# Altium PCB AVP32F335-V1.1.PcbDoc
Units mm, origin at the board's own origin, x right, y up, seen from the top; angles counter-clockwise.
Board outline 58.16 x 58.08 mm, 2 copper layers (Top Layer, Bottom Layer), stack 1.671 mm thick; 2 components, 176 nets, 358 pads, 1 vias.
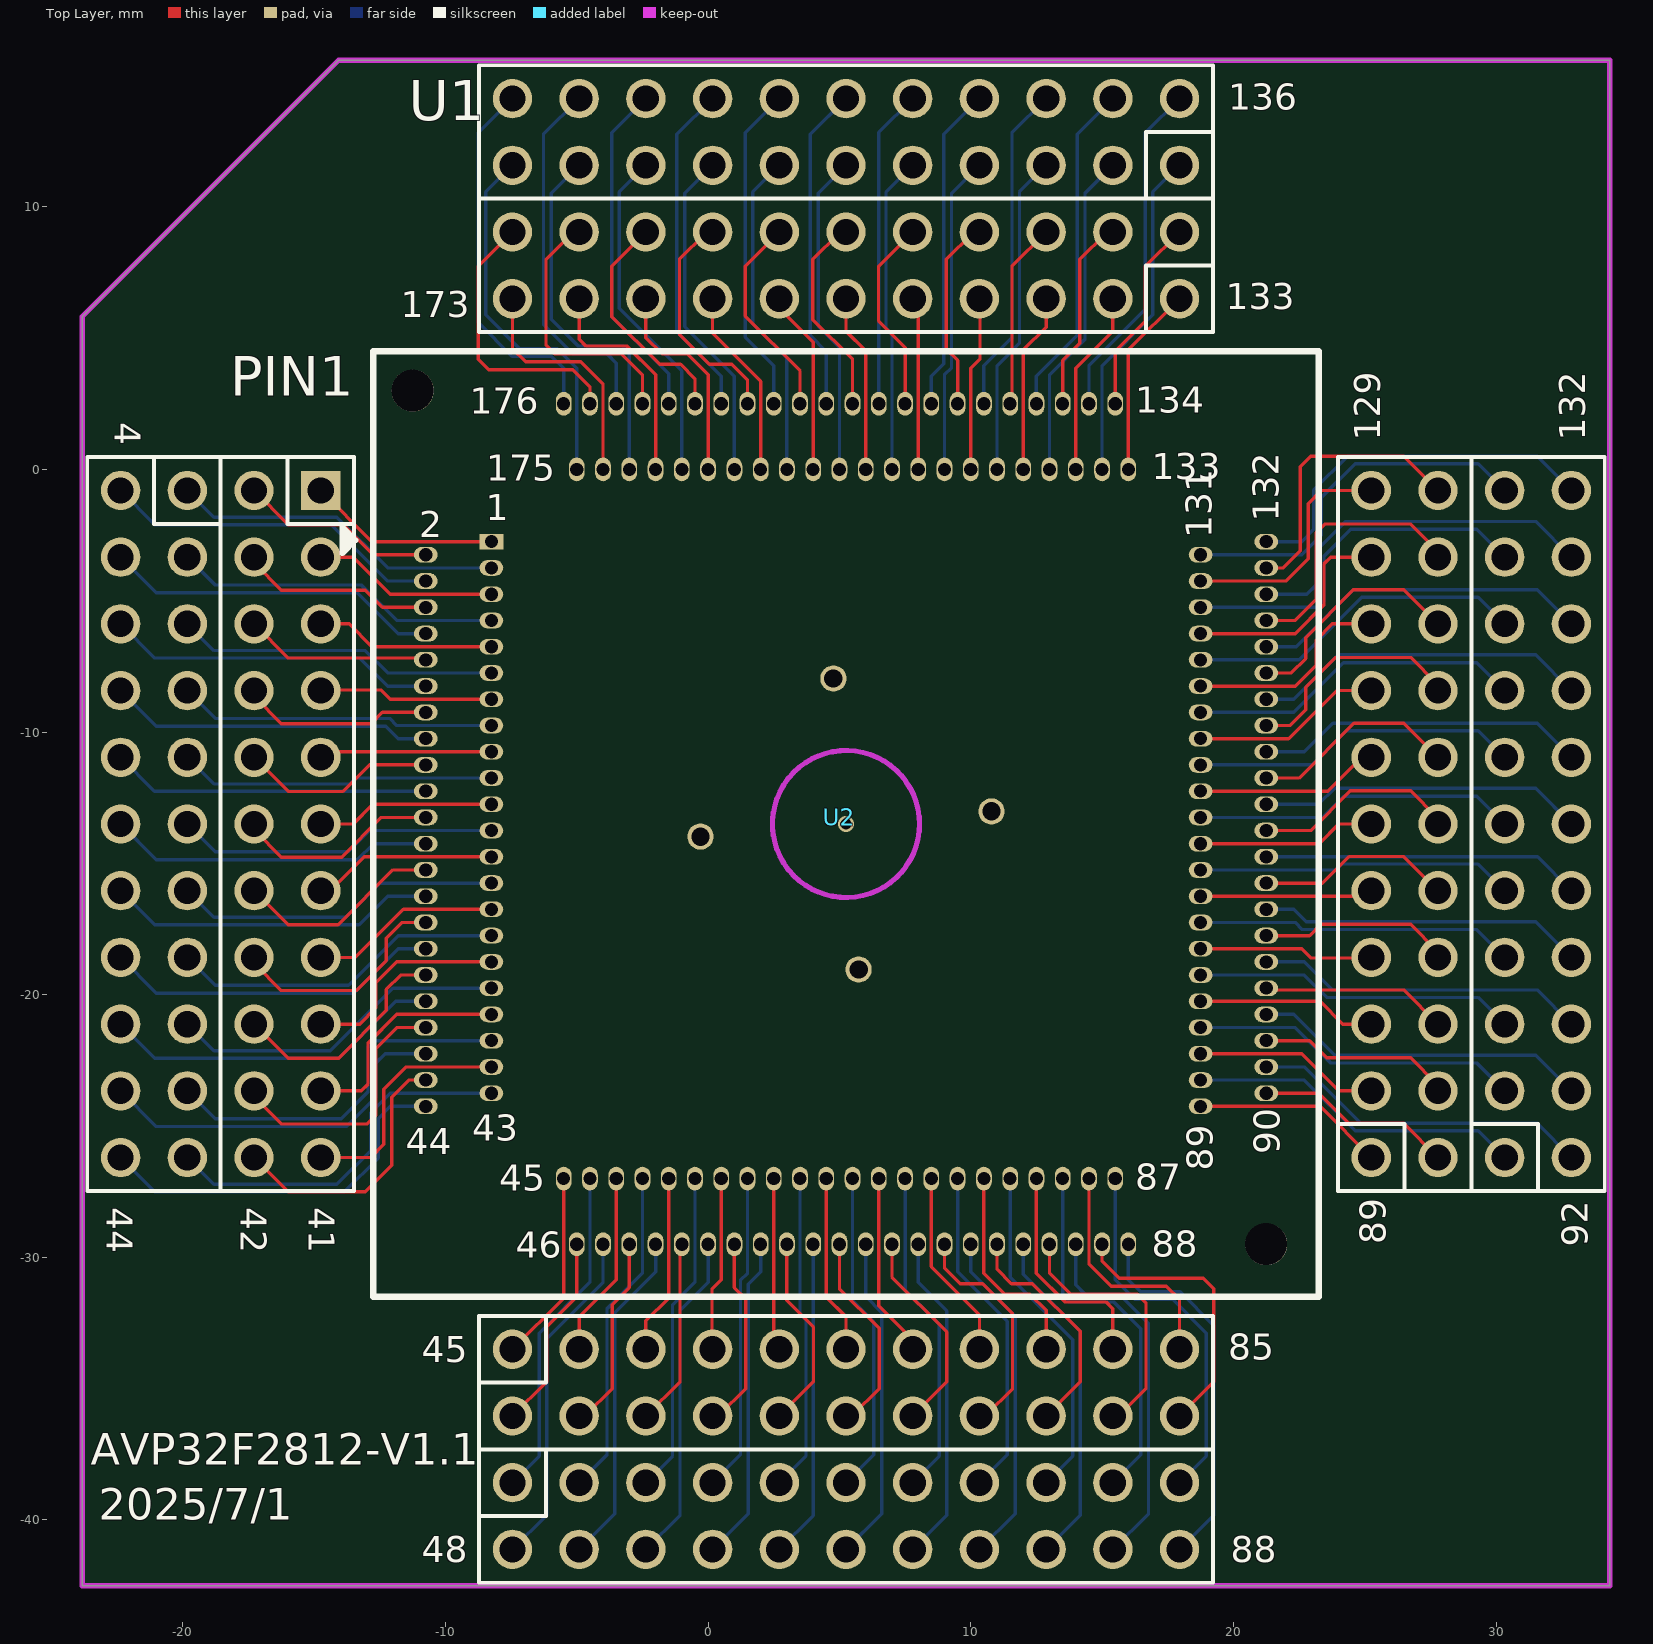
[diagram p0: Top Layer view]
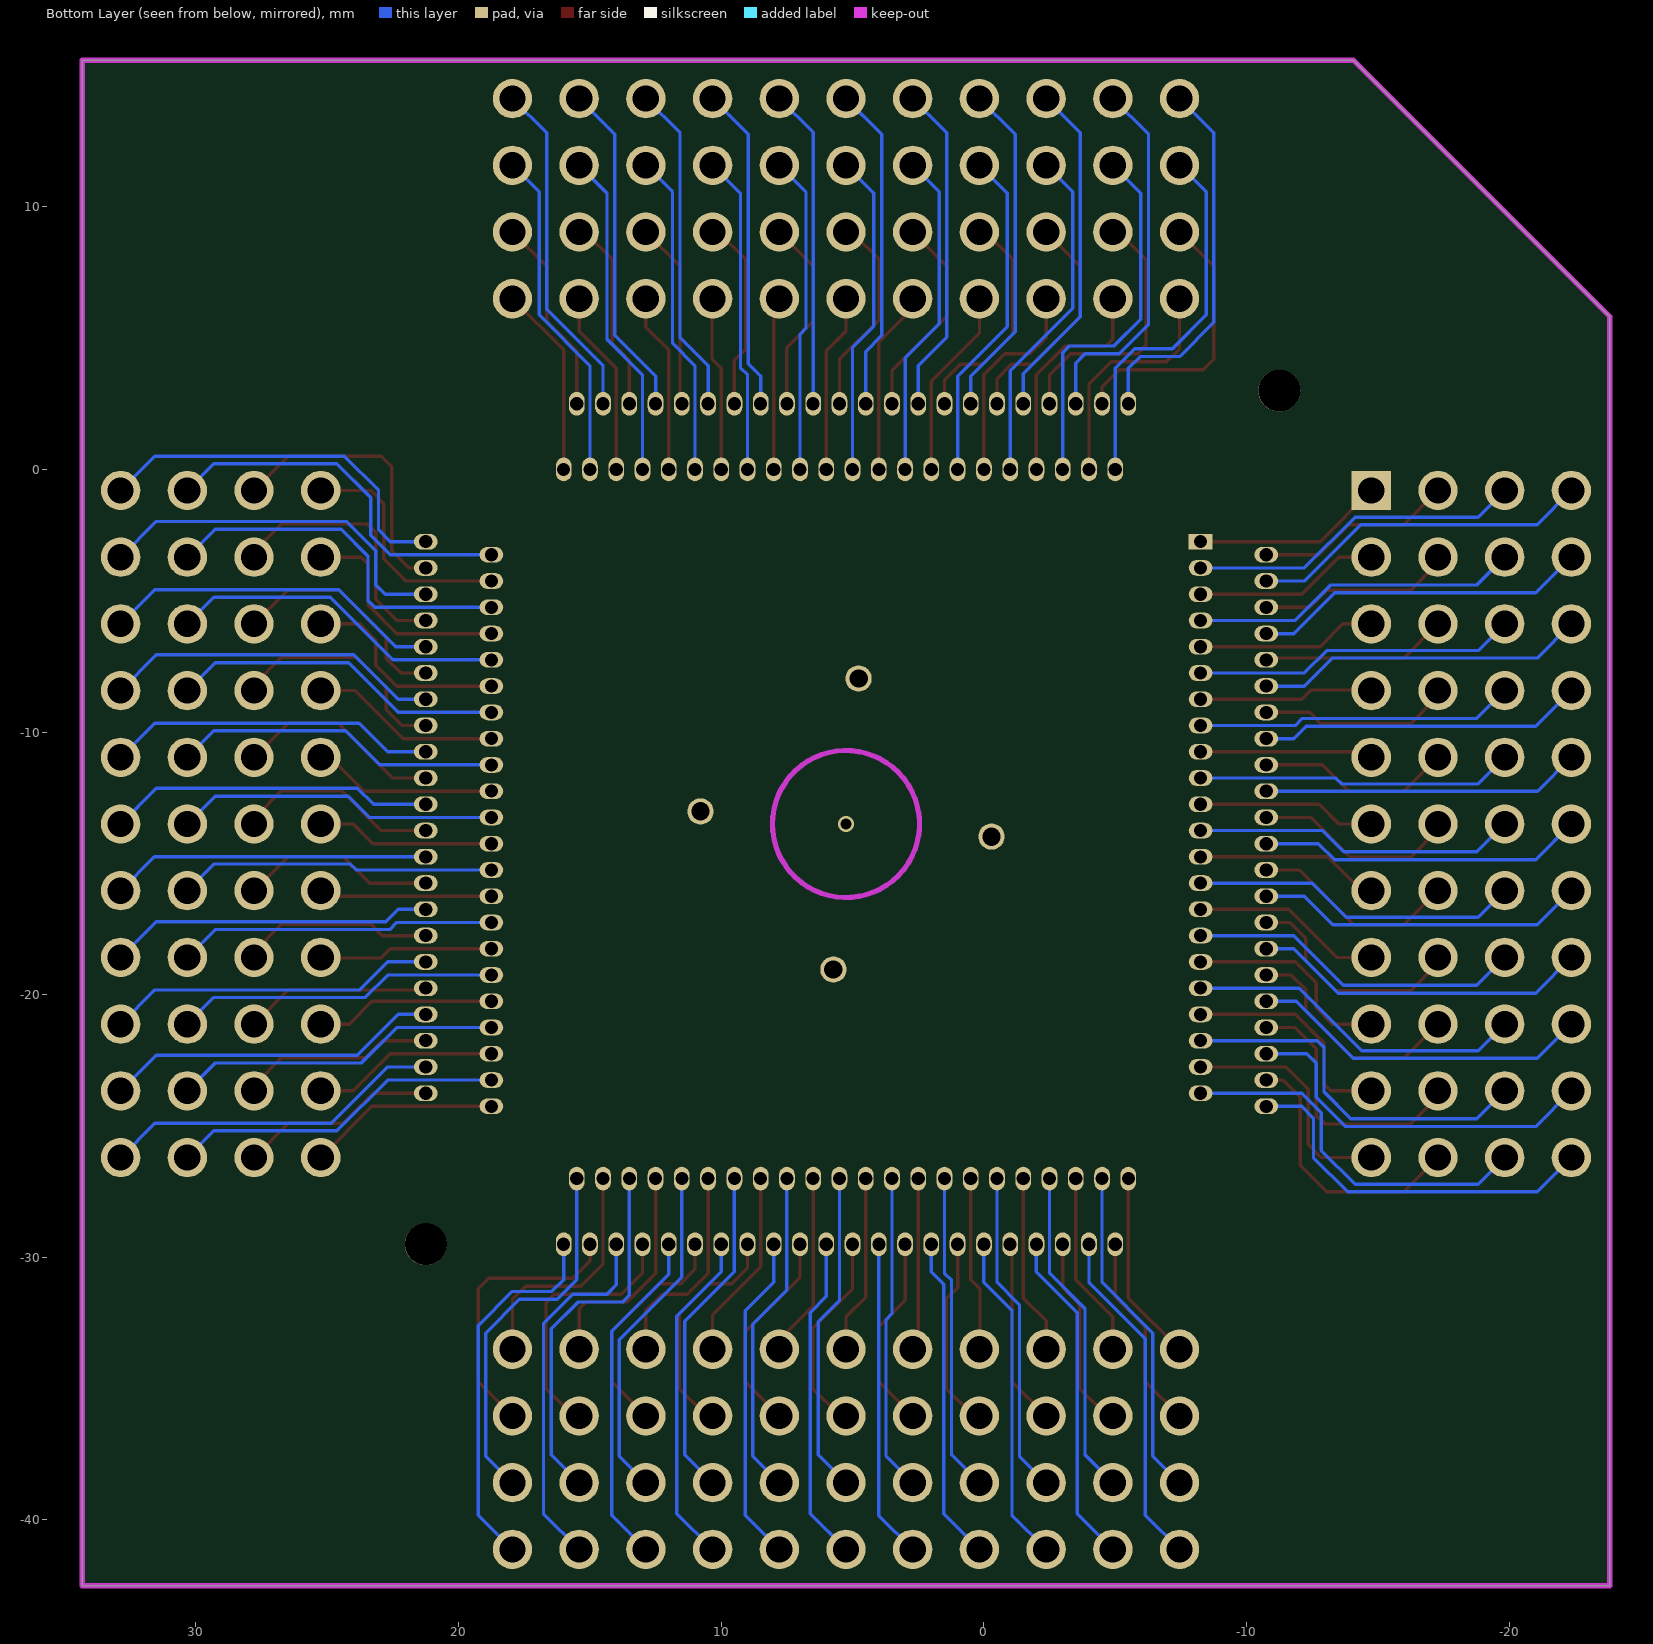
[diagram p1: Bottom Layer view, seen from below]

## Layer stack, top to bottom
Top Solder: solder mask 0.0102, Solder Resist, Dk 3.5
Top Layer: signal copper 0.0356
Dielectric1: dielectric 1.6, FR-4, Dk 4.8
Bottom Layer: signal copper 0.0356
Bottom Solder: solder mask 0.0102, Solder Resist, Dk 3.5

## Board outline
-23.83,-42.5 -23.83,5.82 -14.07,15.58 34.33,15.58 34.33,-42.5

## Design rules (kind name [scope] priority, off if disabled: settings)
Clearance [All] p1: gap=0.127 ignorepadtopadclearanceinfootprint=FALSE except(0: Arc-Hole Track-Hole SMDPad-Hole THPad-Hole Via-Hole Fill-Hole Poly-Hole Region-Hole Text-Hole)
ComponentClearance [All] p1: gap=0 collisioncheckmode=3 verticalgap=0 showdistances=FALSE
FabricationTestpoint [(IsPad And (OnTopLayer Or OnBottomLayer))] p1: side=3 testpointundercomponent=TRUE minsize=1.016 maxsize=2.54 preferedsize=1.524 minholesize=0 maxholesize=1.016 preferedholesize=0.813 testpointgrid=0.025 allowsidetop=TRUE allowsidebottom=TRUE usegrid=TRUE gridtolerance=0
HoleSize [All] p1: absolutevalues=TRUE maxlimit=10 minlimit=0.025 maxpercent=80.000 minpercent=20.000
PolygonConnect PolygonConnect_PAD [(HasFootprint('IDC2X12B') OR HasFootprint('QFP-80-CSZ') OR HasFootprint('IDC14-L') OR HasFootprint('IDC14-L') OR HasFootprint('SO-8') OR HasFootprint('DC-005') OR HasFootprint('QFN-48_TEST2') OR HasFootprint('SMD_LED0805_LED') OR HasFootprint('SOT-23-6') OR HasFootprint('SC70-5') OR HasFootprint('SOT-25') OR HasFootprint('CASE-B_3528') OR HasFootprint('Keystone5002') OR HasFootprint('MOS-SOT23'))] p1: connectstyle=Relief reliefconductorwidth=0.254 reliefentries=4 polygonreliefangle="45 Angle" airgapwidth=0.254
PolygonConnect [All] p2: connectstyle=Direct reliefconductorwidth=0.254 reliefentries=4 polygonreliefangle="90 Angle" airgapwidth=0.254
RoutingVias [All] p1: holewidth=0.381 width=0.787 viastyle="Through Hole" minholewidth=0.254 minwidth=0.762 maxholewidth=0.711 maxwidth=1.27
SolderMaskExpansion [All] p1: expansion=0.102
Width [All] p1: maxlimit=25.4 minlimit=0.1 preferedwidth=0.203 minimp=50.000000 maximp=50.000000 favimp=50.000000
27 further rules are at their usual default settings.

## Components (designator, comment, footprint, x,y, rotation, side; value= is the part's Value field where it differs from the comment)
U1 "ADP32F2812" AVP32F335 5.25,-13.5 r0 top locked
U2 "ADP32F2812" OTQ-176-0.5-10a 5.25,-13.5 r0 top locked

## Footprints (in the part's own frame and the unit in brackets; to place one, negate y for a bottom-side part, rotate by r counter-clockwise, add the part's x,y. Pads: shape width x height; smd on the part's side, far side on the other; paste and mask are expansions set on the pad)
AVP32F335 [mm]
  rect 1.5x1.5 hole 1: 1(-20,12.7)
  round 1.5 hole 1: 2(-22.54,12.7) 3(-25.08,12.7) 4(-27.62,12.7) 5(-20,10.16) 6(-22.54,10.16) 7(-25.08,10.16) 8(-27.62,10.16) 9(-20,7.62) 10(-22.54,7.62) 11(-25.08,7.62) 12(-27.62,7.62) 13(-20,5.08) 14(-22.54,5.08) 15(-25.08,5.08) 16(-27.62,5.08) 17(-20,2.54) 18(-22.54,2.54) 19(-25.08,2.54) 20(-27.62,2.54) 21(-20,0) 22(-22.54,0) 23(-25.08,0) 24(-27.62,0) 25(-20,-2.54) 26(-22.54,-2.54) 27(-25.08,-2.54) 28(-27.62,-2.54) 29(-20,-5.08) 30(-22.54,-5.08) 31(-25.08,-5.08) 32(-27.62,-5.08) 33(-20,-7.62) 34(-22.54,-7.62) 35(-25.08,-7.62) 36(-27.62,-7.62) 37(-20,-10.16) 38(-22.54,-10.16) 39(-25.08,-10.16) 40(-27.62,-10.16) 41(-20,-12.7) 42(-22.54,-12.7) 43(-25.08,-12.7) 44(-27.62,-12.7) 45(-12.7,-20) 46(-12.7,-22.54) 47(-12.7,-25.08) 48(-12.7,-27.62) 49(-10.16,-20) 50(-10.16,-22.54) 51(-10.16,-25.08) 52(-10.16,-27.62) 53(-7.62,-20) 54(-7.62,-22.54) 55(-7.62,-25.08) 56(-7.62,-27.62) 57(-5.08,-20) 58(-5.08,-22.54) 59(-5.08,-25.08) 60(-5.08,-27.62) 61(-2.54,-20) 62(-2.54,-22.54) 63(-2.54,-25.08) 64(-2.54,-27.62) 65(0,-20) 66(0,-22.54) 67(0,-25.08) 68(0,-27.62) 69(2.54,-20) 70(2.54,-22.54) 71(2.54,-25.08) 72(2.54,-27.62) 73(5.08,-20) 74(5.08,-22.54) 75(5.08,-25.08) 76(5.08,-27.62) 77(7.62,-20) 78(7.62,-22.54) 79(7.62,-25.08) 80(7.62,-27.62) 81(10.16,-20) 82(10.16,-22.54) 83(10.16,-25.08) 84(10.16,-27.62) 85(12.7,-20) 86(12.7,-22.54) 87(12.7,-25.08) 88(12.7,-27.62) 89(20,-12.7) 90(22.54,-12.7) 91(25.08,-12.7) 92(27.62,-12.7) 93(20,-10.16) 94(22.54,-10.16) 95(25.08,-10.16) 96(27.62,-10.16) 97(20,-7.62) 98(22.54,-7.62) 99(25.08,-7.62) 100(27.62,-7.62) 101(20,-5.08) 102(22.54,-5.08) 103(25.08,-5.08) 104(27.62,-5.08) 105(20,-2.54) 106(22.54,-2.54) 107(25.08,-2.54) 108(27.62,-2.54) 109(20,0) 110(22.54,0) 111(25.08,0) 112(27.62,0) 113(20,2.54) 114(22.54,2.54) 115(25.08,2.54) 116(27.62,2.54) 117(20,5.08) 118(22.54,5.08) 119(25.08,5.08) 120(27.62,5.08) 121(20,7.62) 122(22.54,7.62) 123(25.08,7.62) 124(27.62,7.62) 125(20,10.16) 126(22.54,10.16) 127(25.08,10.16) 128(27.62,10.16) 129(20,12.7) 130(22.54,12.7) 131(25.08,12.7) 132(27.62,12.7) 133(12.7,20) 134(12.7,22.54) 135(12.7,25.08) 136(12.7,27.62) 137(10.16,20) 138(10.16,22.54) 139(10.16,25.08) 140(10.16,27.62) 141(7.62,20) 142(7.62,22.54) 143(7.62,25.08) 144(7.62,27.62) 145(5.08,20) 146(5.08,22.54) 147(5.08,25.08) 148(5.08,27.62) 149(2.54,20) 150(2.54,22.54) 151(2.54,25.08) 152(2.54,27.62) 153(0,20) 154(0,22.54) 155(0,25.08) 156(0,27.62) 157(-2.54,20) 158(-2.54,22.54) 159(-2.54,25.08) 160(-2.54,27.62) 161(-5.08,20) 162(-5.08,22.54) 163(-5.08,25.08) 164(-5.08,27.62) 165(-7.62,20) 166(-7.62,22.54) 167(-7.62,25.08) 168(-7.62,27.62) 169(-10.16,20) 170(-10.16,22.54) 171(-10.16,25.08) 172(-10.16,27.62) 173(-12.7,20) 174(-12.7,22.54) 175(-12.7,25.08) 176(-12.7,27.62)
  silkscreen extent -28.89,-28.89 28.89,28.89
OTQ-176-0.5-10a [mm]
  round 1.6 hole 1.6: 0(-16.5,16.5) 0(16,-16)
  round 1 hole 0.7: 0(-5.54,-0.48) 0(-0.48,5.54) 0(0.48,-5.54) 0(5.54,0.48)
  rect 0.9x0.6 hole 0.5: 1(-13.5,10.75)
  oval 0.9x0.6 hole 0.5: 2(-16,10.25) 3(-13.5,9.75) 4(-16,9.25) 5(-13.5,8.75) 6(-16,8.25) 7(-13.5,7.75) 8(-16,7.25) 9(-13.5,6.75) 10(-16,6.25) 11(-13.5,5.75) 12(-16,5.25) 13(-13.5,4.75) 14(-16,4.25) 15(-13.5,3.75) 16(-16,3.25) 17(-13.5,2.75) 18(-16,2.25) 19(-13.5,1.75) 20(-16,1.25) 21(-13.5,0.75) 22(-16,0.25) 23(-13.5,-0.25) 24(-16,-0.75) 25(-13.5,-1.25) 26(-16,-1.75) 27(-13.5,-2.25) 28(-16,-2.75) 29(-13.5,-3.25) 30(-16,-3.75) 31(-13.5,-4.25) 32(-16,-4.75) 33(-13.5,-5.25) 34(-16,-5.75) 35(-13.5,-6.25) 36(-16,-6.75) 37(-13.5,-7.25) 38(-16,-7.75) 39(-13.5,-8.25) 40(-16,-8.75) 41(-13.5,-9.25) 42(-16,-9.75) 43(-13.5,-10.25) 44(-16,-10.75) 89(13.5,-10.75) 90(16,-10.25) 91(13.5,-9.75) 92(16,-9.25) 93(13.5,-8.75) 94(16,-8.25) 95(13.5,-7.75) 96(16,-7.25) 97(13.5,-6.75) 98(16,-6.25) 99(13.5,-5.75) 100(16,-5.25) 101(13.5,-4.75) 102(16,-4.25) 103(13.5,-3.75) 104(16,-3.25) 105(13.5,-2.75) 106(16,-2.25) 107(13.5,-1.75) 108(16,-1.25) 109(13.5,-0.75) 110(16,-0.25) 111(13.5,0.25) 112(16,0.75) 113(13.5,1.25) 114(16,1.75) 115(13.5,2.25) 116(16,2.75) 117(13.5,3.25) 118(16,3.75) 119(13.5,4.25) 120(16,4.75) 121(13.5,5.25) 122(16,5.75) 123(13.5,6.25) 124(16,6.75) 125(13.5,7.25) 126(16,7.75) 127(13.5,8.25) 128(16,8.75) 129(13.5,9.25) 130(16,9.75) 131(13.5,10.25) 132(16,10.75)
  oval 0.6x0.9 hole 0.5: 45(-10.75,-13.5) 46(-10.25,-16) 47(-9.75,-13.5) 48(-9.25,-16) 49(-8.75,-13.5) 50(-8.25,-16) 51(-7.75,-13.5) 52(-7.25,-16) 53(-6.75,-13.5) 54(-6.25,-16) 55(-5.75,-13.5) 56(-5.25,-16) 57(-4.75,-13.5) 58(-4.25,-16) 59(-3.75,-13.5) 60(-3.25,-16) 61(-2.75,-13.5) 62(-2.25,-16) 63(-1.75,-13.5) 64(-1.25,-16) 65(-0.75,-13.5) 66(-0.25,-16) 67(0.25,-13.5) 68(0.75,-16) 69(1.25,-13.5) 70(1.75,-16) 71(2.25,-13.5) 72(2.75,-16) 73(3.25,-13.5) 74(3.75,-16) 75(4.25,-13.5) 76(4.75,-16) 77(5.25,-13.5) 78(5.75,-16) 79(6.25,-13.5) 80(6.75,-16) 81(7.25,-13.5) 82(7.75,-16) 83(8.25,-13.5) 84(8.75,-16) 85(9.25,-13.5) 86(9.75,-16) 87(10.25,-13.5) 88(10.75,-16) 133(10.75,13.5) 134(10.25,16) 135(9.75,13.5) 136(9.25,16) 137(8.75,13.5) 138(8.25,16) 139(7.75,13.5) 140(7.25,16) 141(6.75,13.5) 142(6.25,16) 143(5.75,13.5) 144(5.25,16) 145(4.75,13.5) 146(4.25,16) 147(3.75,13.5) 148(3.25,16) 149(2.75,13.5) 150(2.25,16) 151(1.75,13.5) 152(1.25,16) 153(0.75,13.5) 154(0.25,16) 155(-0.25,13.5) 156(-0.75,16) 157(-1.25,13.5) 158(-1.75,16) 159(-2.25,13.5) 160(-2.75,16) 161(-3.25,13.5) 162(-3.75,16) 163(-4.25,13.5) 164(-4.75,16) 165(-5.25,13.5) 166(-5.75,16) 167(-6.25,13.5) 168(-6.75,16) 169(-7.25,13.5) 170(-7.75,16) 171(-8.25,13.5) 172(-8.75,16) 173(-9.25,13.5) 174(-9.75,16) 175(-10.25,13.5) 176(-10.75,16)
  Keep-Out Layer circle w0.2: c0,0 r2.8
  silkscreen extent -18,-18 18,18

## Part data
U1 U2: Mfr_Name="Texas Instruments", RefDes=RefDes, Type=Type

## Via types
v1: diameter 0.6, hole 0.4, Top Layer to Bottom Layer, 1 vias

## Nets (pads, with @x,y where several pads share a name; then routed paths per layer and width w, separated by ;. In a path a pad name is that pad's centre, name@x,y a point inside that pad or via, vN(x,y) a via of type N, cw(c..) or ccw(c..) an arc to the next point about the centre after c; other vN are vias at no path point)
NetU1_1: U1.1 U2.1 | length 7.3
  Top Layer w0.127: U1.1 -12.8,-2.75 U2.1
NetU1_2: U1.2 U2.2 | length 7.6
  Top Layer w0.127: U1.2 -15.99,-2.1 -13.9,-2.1 -12.75,-3.25 U2.2
NetU1_3: U1.3 U2.3 | length 12.8
  Bottom Layer w0.127: U1.3 -18.814,-1.816 -14.134,-1.816 -12.2,-3.75 U2.3
NetU1_4: U1.4 U2.4 | length 13
  Bottom Layer w0.127: U1.4 -21.07,-2.1 -14.35,-2.1 -12.2,-4.25 U2.4
NetU1_5: U1.5 U2.5 | length 7.1
  Top Layer w0.127: U1.5 -13.51,-3.34 -12.1,-4.75 U2.5
NetU1_6: U1.6 U2.6 | length 7.2
  Top Layer w0.127: U1.6@-17.25,-3.6 -16.25,-4.6 -13.05,-4.6 -12.4,-5.25 U2.6
NetU1_7: U1.7 U2.7 | length 12.6
  Bottom Layer w0.127: U1.7 -18.77,-4.4 -13.2,-4.4 -11.85,-5.75 U2.7
NetU1_8: U1.8 U2.8 | length 12.8
  Bottom Layer w0.127: U1.8 -21.01,-4.7 -13.35,-4.7 -11.8,-6.25 U2.8
NetU1_9: U1.9 U2.9 | length 6.9
  Top Layer w0.127: U1.9 -13.67,-5.88 -12.8,-6.75 U2.9
NetU1_10: U1.10 U2.10 | length 7.1
  Top Layer w0.127: U1.10 -15.99,-7.18 -10.82,-7.18 U2.10
NetU1_11: U1.11 U2.11 | length 12.4
  Bottom Layer w0.127: U1.11 -18.814,-6.896 -13.054,-6.896 -12.2,-7.75 U2.11
NetU1_12: U1.12 U2.12 | length 12.6
  Bottom Layer w0.127: U1.12 -21.07,-7.18 -13.27,-7.18 -12.2,-8.25 U2.12
NetU1_13: U1.13 U2.13 | length 6.7
  Top Layer w0.127: U1.13 -14.73,-8.4 -12.45,-8.4 -12.1,-8.75 U2.13
NetU1_14: U1.14 U2.14 | length 7.1
  Top Layer w0.127: U1.14@-17.25,-8.68 -16.25,-9.68 -12.83,-9.68 -12.4,-9.25 U2.14
NetU1_15: U1.15 U2.15 | length 12.1
  Bottom Layer w0.127: U1.15 -18.77,-9.48 -12.12,-9.48 -11.85,-9.75 U2.15
NetU1_16: U1.16 U2.16 | length 12.4
  Bottom Layer w0.127: U1.16 -21.01,-9.78 -12.27,-9.78 -11.8,-10.25 U2.16
NetU1_17: U1.17 U2.17 | length 6.6
  Top Layer w0.127: U1.17 -14.54,-10.75 U2.17
NetU1_18: U1.18 U2.18 | length 7.5
  Top Layer w0.127: U1.18 -15.99,-12.26 -13.9,-12.26 -12.89,-11.25 U2.18
NetU1_19: U1.19 U2.19 | length 12.1
  Bottom Layer w0.127: U1.19 -18.814,-11.976 -13.626,-11.976 -13.4,-11.75 U2.19
NetU1_20: U1.20 U2.20 | length 12.2
  Bottom Layer w0.127: U1.20 -21.08,-12.25 U2.20
NetU1_21: U1.21 U2.21 | length 6.8
  Top Layer w0.127: U1.21 -13.51,-13.5 -12.76,-12.75 U2.21
NetU1_22: U1.22 U2.22 | length 7.5
  Top Layer w0.127: U1.22@-17.25,-13.76 -16.25,-14.76 -13.95,-14.76 -12.44,-13.25 U2.22
NetU1_23: U1.23 U2.23 | length 12.4
  Bottom Layer w0.127: U1.23 -18.77,-14.56 -13.71,-14.56 -12.9,-13.75 U2.23
NetU1_24: U1.24 U2.24 | length 12.4
  Bottom Layer w0.127: U1.24 -21.01,-14.86 -13.35,-14.86 -12.74,-14.25 U2.24
NetU1_25: U1.25 U2.25 | length 6.6
  Top Layer w0.127: U1.25@-14.35,-16 -13.1,-14.75 U2.25
NetU1_26: U1.26 U2.26 | length 7.9
  Top Layer w0.127: U1.26 -15.99,-17.34 -14.09,-17.34 -12,-15.25 U2.26
NetU1_27: U1.27 U2.27 | length 12.5
  Bottom Layer w0.127: U1.27 -18.814,-17.056 -13.806,-17.056 -12.5,-15.75 U2.27
NetU1_28: U1.28 U2.28 | length 12.6
  Bottom Layer w0.127: U1.28 -21.07,-17.34 -13.29,-17.34 -12.2,-16.25 U2.28
NetU1_29: U1.29 U2.29 | length 7.3
  Top Layer w0.127: U1.29 -13.43,-18.58 -11.6,-16.75 U2.29
NetU1_30: U1.30 U2.30 | length 8.5
  Top Layer w0.127: U1.30@-17.25,-18.84 -16.25,-19.84 -13.39,-19.84 -12.25,-18.7 -12.25,-17.85 -11.65,-17.25 U2.30
NetU1_31: U1.31 U2.31 | length 12.8
  Bottom Layer w0.127: U1.31 -18.77,-19.64 -13.69,-19.64 -11.8,-17.75 U2.31
NetU1_32: U1.32 U2.32 | length 12.9
  Bottom Layer w0.127: U1.32 -21.01,-19.94 -13.49,-19.94 -11.8,-18.25 U2.32
NetU1_33: U1.33 U2.33 | length 8
  Top Layer w0.127: U1.33 -13.27,-21.12 -12.65,-20.5 -12.65,-19.55 -11.85,-18.75 U2.33
NetU1_34: U1.34 U2.34 | length 8.9
  Top Layer w0.127: U1.34 -15.99,-22.42 -14.07,-22.42 -12.25,-20.6 -12.25,-19.8 -11.7,-19.25 U2.34
NetU1_35: U1.35 U2.35 | length 13
  Bottom Layer w0.127: U1.35 -18.814,-22.136 -14.386,-22.136 -12,-19.75 U2.35
NetU1_36: U1.36 U2.36 | length 13.1
  Bottom Layer w0.127: U1.36 -21.07,-22.42 -14.07,-22.42 -11.9,-20.25 U2.36
NetU1_37: U1.37 U2.37 | length 8.6
  Top Layer w0.127: U1.37 -13.21,-23.66 -12.95,-23.4 -12.95,-21.85 -11.85,-20.75 U2.37
NetU1_38: U1.38 U2.38 | length 9.9
  Top Layer w0.127: U1.38@-17.25,-23.92 -16.25,-24.92 -12.97,-24.92 -12.65,-24.6 -12.65,-22.05 -12.393,-21.793 -12.365,-21.765 -11.85,-21.25 U2.38
NetU1_39: U1.39 U2.39 | length 14.2
  Bottom Layer w0.127: U1.39 -18.77,-24.72 -13.97,-24.72 -12.95,-23.7 -12.95,-22 -12.7,-21.75 U2.39
NetU1_40: U1.40 U2.40 | length 14.1
  Bottom Layer w0.127: U1.40 -21.01,-25.02 -13.77,-25.02 -12.65,-23.9 -12.65,-22.6 -12.3,-22.25 U2.40
NetU1_41: U1.41 U2.41 | length 9.2
  Top Layer w0.127: U1.41 -12.85,-26.2 -12.35,-25.7 -12.35,-23.6 -11.5,-22.75 U2.41
NetU1_42: U1.42 U2.42 | length 10.4
  Top Layer w0.127: U1.42 -15.99,-27.5 -13.25,-27.5 -13.05,-27.5 -12.05,-26.5 -12.05,-23.9 -11.4,-23.25 U2.42
NetU1_43: U1.43 U2.43 | length 14.3
  Bottom Layer w0.127: U1.43 -18.814,-27.216 -14.134,-27.216 -12.85,-25.932 -12.85,-24.5 -12.1,-23.75 U2.43
NetU1_44: U1.44 U2.44 | length 14.4
  Bottom Layer w0.127: U1.44 -21.07,-27.5 -13.85,-27.5 -12.55,-26.2 -12.55,-24.7 -12.1,-24.25 U2.44
NetU1_45: U1.45 U2.45 | length 7.3
  Top Layer w0.127: U1.45 -5.5,-31.55 U2.45
NetU1_46: U1.46 U2.46 | length 7.6
  Top Layer w0.127: U1.46 -6.15,-34.74 -6.15,-32.65 -5,-31.5 U2.46
NetU1_47: U1.47 U2.47 | length 12.8
  Bottom Layer w0.127: U1.47 -6.434,-37.564 -6.434,-32.884 -4.5,-30.95 U2.47@-4.5,-27
NetU1_48: U1.48 U2.48 | length 13
  Bottom Layer w0.127: U1.48 -6.15,-39.82 -6.15,-33.1 -4,-30.95 U2.48
NetU1_49: U1.49 U2.49 | length 7.1
  Top Layer w0.127: U1.49 -4.91,-32.26 -3.5,-30.85 U2.49
NetU1_50: U1.50 U2.50 | length 7.2
  Top Layer w0.127: U1.50@-4.65,-36 -3.65,-35 -3.65,-31.8 -3,-31.15 U2.50
NetU1_51: U1.51 U2.51 | length 12.6
  Bottom Layer w0.127: U1.51 -3.85,-37.52 -3.85,-31.95 -2.5,-30.6 U2.51
NetU1_52: U1.52 U2.52 | length 12.8
  Bottom Layer w0.127: U1.52 -3.55,-39.76 -3.55,-32.1 -2,-30.55 U2.52
NetU1_53: U1.53 U2.53 | length 6.9
  Top Layer w0.127: U1.53 -2.37,-32.42 -1.5,-31.55 U2.53
NetU1_54: U1.54 U2.54 | length 7.1
  Top Layer w0.127: U1.54 -1.07,-34.74 -1.07,-29.57 U2.54
NetU1_55: U1.55 U2.55 | length 12.4
  Bottom Layer w0.127: U1.55 -1.354,-37.564 -1.354,-31.804 -0.5,-30.95 U2.55
NetU1_56: U1.56 U2.56 | length 12.6
  Bottom Layer w0.127: U1.56 -1.07,-39.82 -1.07,-32.02 0,-30.95 U2.56
NetU1_57: U1.57 U2.57 | length 6.7
  Top Layer w0.127: U1.57 0.15,-33.48 0.15,-31.2 0.5,-30.85 U2.57
NetU1_58: U1.58 U2.58 | length 7.1
  Top Layer w0.127: U1.58@0.43,-36 1.43,-35 1.43,-31.58 1,-31.15 U2.58
NetU1_59: U1.59 U2.59 | length 12.1
  Bottom Layer w0.127: U1.59 1.23,-37.52 1.23,-30.87 1.5,-30.6 U2.59
NetU1_60: U1.60 U2.60 | length 12.4
  Bottom Layer w0.127: U1.60 1.53,-39.76 1.53,-31.02 2,-30.55 U2.60
NetU1_61: U1.61 U2.61 | length 6.6
  Top Layer w0.127: U2.61 2.5,-33.29 U1.61
NetU1_62: U1.62 U2.62 | length 7.5
  Top Layer w0.127: U1.62 4.01,-34.74 4.01,-32.65 3,-31.64 U2.62
NetU1_63: U1.63 U2.63 | length 12.1
  Bottom Layer w0.127: U1.63 3.726,-37.564 3.726,-32.376 3.5,-32.15 U2.63
NetU1_64: U1.64 U2.64 | length 12.2
  Bottom Layer w0.127: U1.64 4,-39.83 U2.64
NetU1_65: U1.65 U2.65 | length 6.8
  Top Layer w0.127: U2.65 4.5,-31.51 5.25,-32.26 U1.65
NetU1_66: U1.66 U2.66 | length 7.5
  Top Layer w0.127: U2.66 5,-31.19 6.51,-32.7 6.51,-35 U1.66@5.51,-36
NetU1_67: U1.67 U2.67 | length 12.4
  Bottom Layer w0.127: U1.67 6.31,-37.52 6.31,-32.46 5.5,-31.65 U2.67@5.5,-27
NetU1_68: U1.68 U2.68 | length 12.4
  Bottom Layer w0.127: U1.68 6.61,-39.76 6.61,-32.1 6,-31.49 U2.68
NetU1_69: U1.69 U2.69 | length 6.6
  Top Layer w0.127: U2.69 6.5,-31.85 U1.69@7.75,-33.1
NetU1_70: U1.70 U2.70 | length 7.9
  Top Layer w0.127: U2.70 7,-30.75 9.09,-32.84 9.09,-34.74 U1.70
NetU1_71: U1.71 U2.71 | length 12.5
  Bottom Layer w0.127: U2.71 7.5,-31.25 8.806,-32.556 8.806,-37.564 U1.71
NetU1_72: U1.72 U2.72 | length 12.6
  Bottom Layer w0.127: U1.72 9.09,-39.82 9.09,-32.04 8,-30.95 U2.72
NetU1_73: U1.73 U2.73 | length 7.3
  Top Layer w0.127: U2.73 8.5,-30.35 10.33,-32.18 U1.73
NetU1_74: U1.74 U2.74 | length 8.5
  Top Layer w0.127: U2.74 9,-30.4 9.6,-31 10.45,-31 11.59,-32.14 11.59,-35 U1.74@10.59,-36
NetU1_75: U1.75 U2.75 | length 12.8
  Bottom Layer w0.127: U2.75 9.5,-30.55 11.39,-32.44 11.39,-37.52 U1.75
NetU1_76: U1.76 U2.76 | length 12.9
  Bottom Layer w0.127: U2.76 10,-30.55 11.69,-32.24 11.69,-39.76 U1.76
NetU1_77: U1.77 U2.77 | length 8
  Top Layer w0.127: U2.77 10.5,-30.6 11.3,-31.4 12.25,-31.4 12.87,-32.02 U1.77
NetU1_78: U1.78 U2.78 | length 8.9
  Top Layer w0.127: U2.78 11,-30.45 11.55,-31 12.35,-31 14.17,-32.82 14.17,-34.74 U1.78
NetU1_79: U1.79 U2.79 | length 13
  Bottom Layer w0.127: U2.79 11.5,-30.75 13.886,-33.136 13.886,-37.564 U1.79
NetU1_80: U1.80 U2.80 | length 13.1
  Bottom Layer w0.127: U2.80 12,-30.65 14.17,-32.82 14.17,-39.82 U1.80
NetU1_81: U1.81 U2.81 | length 8.6
  Top Layer w0.127: U2.81 12.5,-30.6 13.6,-31.7 15.15,-31.7 15.41,-31.96 U1.81
NetU1_82: U1.82 U2.82 | length 9.9
  Top Layer w0.127: U2.82 13,-30.6 13.515,-31.115 13.543,-31.143 13.8,-31.4 16.35,-31.4 16.67,-31.72 16.67,-35 U1.82@15.67,-36
NetU1_83: U1.83 U2.83 | length 14.2
  Bottom Layer w0.127: U2.83 13.5,-31.45 13.75,-31.7 15.45,-31.7 16.47,-32.72 16.47,-37.52 U1.83
NetU1_84: U1.84 U2.84 | length 14.1
  Bottom Layer w0.127: U2.84 14,-31.05 14.35,-31.4 15.65,-31.4 16.77,-32.52 16.77,-39.76 U1.84
NetU1_85: U1.85 U2.85 | length 9.2
  Top Layer w0.127: U2.85 14.5,-30.25 15.35,-31.1 17.45,-31.1 17.95,-31.6 U1.85
NetU1_86: U1.86 U2.86 | length 10.7
  Top Layer w0.127: U2.86 15,-30.15 15.65,-30.8 18.85,-30.8 19.25,-31.2 19.25,-34.74 U1.86
NetU1_87: U1.87 U2.87 | length 14.3
  Bottom Layer w0.127: U2.87@15.5,-27 15.5,-30.85 16.25,-31.6 17.682,-31.6 18.966,-32.884 18.966,-37.564 U1.87
NetU1_88: U1.88 U2.88 | length 14.4
  Bottom Layer w0.127: U2.88 16,-30.85 16.45,-31.3 17.95,-31.3 19.25,-32.6 19.25,-39.82 U1.88
NetU1_89: U1.89 U2.89 | length 7.3
  Top Layer w0.127: U2.89 23.3,-24.25 U1.89
NetU1_90: U1.90 U2.90 | length 7.6
  Top Layer w0.127: U2.90 23.25,-23.75 24.4,-24.9 26.49,-24.9 U1.90
NetU1_91: U1.91 U2.91 | length 12.8
  Bottom Layer w0.127: U2.91 22.7,-23.25 24.634,-25.184 29.314,-25.184 U1.91
NetU1_92: U1.92 U2.92 | length 13
  Bottom Layer w0.127: U2.92 22.7,-22.75 24.85,-24.9 31.57,-24.9 U1.92
NetU1_93: U1.93 U2.93 | length 7.1
  Top Layer w0.127: U2.93 22.6,-22.25 24.01,-23.66 U1.93
NetU1_94: U1.94 U2.94 | length 7.2
  Top Layer w0.127: U2.94 22.9,-21.75 23.55,-22.4 26.75,-22.4 U1.94@27.75,-23.4
NetU1_95: U1.95 U2.95 | length 12.6
  Bottom Layer w0.127: U2.95 22.35,-21.25 23.7,-22.6 29.27,-22.6 U1.95
NetU1_96: U1.96 U2.96 | length 12.8
  Bottom Layer w0.127: U2.96 22.3,-20.75 23.85,-22.3 31.51,-22.3 U1.96
NetU1_97: U1.97 U2.97 | length 6.9
  Top Layer w0.127: U2.97 23.3,-20.25 24.17,-21.12 U1.97
NetU1_98: U1.98 U2.98 | length 7.1
  Top Layer w0.127: U2.98 21.32,-19.82 26.49,-19.82 U1.98
NetU1_99: U1.99 U2.99 | length 12.4
  Bottom Layer w0.127: U2.99 22.7,-19.25 23.554,-20.104 29.314,-20.104 U1.99
NetU1_100: U1.100 U2.100 | length 12.6
  Bottom Layer w0.127: U2.100 22.7,-18.75 23.77,-19.82 31.57,-19.82 U1.100
NetU1_101: U1.101 U2.101 | length 6.7
  Top Layer w0.127: U2.101 22.6,-18.25 22.95,-18.6 25.23,-18.6 U1.101
NetU1_102: U1.102 U2.102 | length 7.1
  Top Layer w0.127: U2.102 22.9,-17.75 23.33,-17.32 26.75,-17.32 U1.102@27.75,-18.32
NetU1_103: U1.103 U2.103 | length 12.1
  Bottom Layer w0.127: U2.103 22.35,-17.25 22.62,-17.52 29.27,-17.52 U1.103
NetU1_104: U1.104 U2.104 | length 12.4
  Bottom Layer w0.127: U2.104 22.3,-16.75 22.77,-17.22 31.51,-17.22 U1.104
NetU1_105: U1.105 U2.105 | length 6.6
  Top Layer w0.127: U2.105 25.04,-16.25 U1.105
NetU1_106: U1.106 U2.106 | length 7.5
  Top Layer w0.127: U2.106 23.39,-15.75 24.4,-14.74 26.49,-14.74 U1.106
NetU1_107: U1.107 U2.107 | length 12.1
  Bottom Layer w0.127: U2.107 23.9,-15.25 24.126,-15.024 29.314,-15.024 U1.107
NetU1_108: U1.108 U2.108 | length 12.2
  Bottom Layer w0.127: U2.108 31.58,-14.75 U1.108
NetU1_109: U1.109 U2.109 | length 6.8
  Top Layer w0.127: U2.109 23.26,-14.25 24.01,-13.5 U1.109
NetU1_110: U1.110 U2.110 | length 7.5
  Top Layer w0.127: U2.110 22.94,-13.75 24.45,-12.24 26.75,-12.24 U1.110@27.75,-13.24
NetU1_111: U1.111 U2.111 | length 12.4
  Bottom Layer w0.127: U2.111 23.4,-13.25 24.21,-12.44 29.27,-12.44 U1.111
NetU1_112: U1.112 U2.112 | length 12.4
  Bottom Layer w0.127: U2.112 23.24,-12.75 23.85,-12.14 31.51,-12.14 U1.112
NetU1_113: U1.113 U2.113 | length 6.6
  Top Layer w0.127: U2.113 23.6,-12.25 U1.113@24.85,-11
NetU1_114: U1.114 U2.114 | length 7.9
  Top Layer w0.127: U2.114 22.5,-11.75 24.59,-9.66 26.49,-9.66 U1.114
NetU1_115: U1.115 U2.115 | length 12.5
  Bottom Layer w0.127: U2.115 23,-11.25 24.306,-9.944 29.314,-9.944 U1.115
NetU1_116: U1.116 U2.116 | length 12.6
  Bottom Layer w0.127: U2.116 22.7,-10.75 23.79,-9.66 31.57,-9.66 U1.116
NetU1_117: U1.117 U2.117 | length 7.3
  Top Layer w0.127: U2.117 22.1,-10.25 23.93,-8.42 U1.117
NetU1_118: U1.118 U2.118 | length 8.5
  Top Layer w0.127: U2.118 22.15,-9.75 22.75,-9.15 22.75,-8.3 23.89,-7.16 26.75,-7.16 U1.118@27.75,-8.16
NetU1_119: U1.119 U2.119 | length 12.8
  Bottom Layer w0.127: U2.119 22.3,-9.25 24.19,-7.36 29.27,-7.36 U1.119
NetU1_120: U1.120 U2.120 | length 12.9
  Bottom Layer w0.127: U2.120 22.3,-8.75 23.99,-7.06 31.51,-7.06 U1.120
NetU1_121: U1.121 U2.121 | length 8
  Top Layer w0.127: U2.121 22.35,-8.25 23.15,-7.45 23.15,-6.5 23.77,-5.88 U1.121
NetU1_122: U1.122 U2.122 | length 8.9
  Top Layer w0.127: U2.122 22.2,-7.75 22.75,-7.2 22.75,-6.4 24.57,-4.58 26.49,-4.58 U1.122
NetU1_123: U1.123 U2.123 | length 13
  Bottom Layer w0.127: U2.123 22.5,-7.25 24.886,-4.864 29.314,-4.864 U1.123
NetU1_124: U1.124 U2.124 | length 13.1
  Bottom Layer w0.127: U2.124 22.4,-6.75 24.57,-4.58 31.57,-4.58 U1.124
NetU1_125: U1.125 U2.125 | length 8.6
  Top Layer w0.127: U2.125 22.35,-6.25 23.45,-5.15 23.45,-3.6 23.71,-3.34 U1.125
NetU1_126: U1.126 U2.126 | length 9.9
  Top Layer w0.127: U2.126 22.35,-5.75 22.865,-5.235 22.893,-5.207 23.15,-4.95 23.15,-2.4 23.47,-2.08 26.75,-2.08 U1.126@27.75,-3.08
NetU1_127: U1.127 U2.127 | length 14.2
  Bottom Layer w0.127: U2.127 23.2,-5.25 23.45,-5 23.45,-3.3 24.47,-2.28 29.27,-2.28 U1.127
NetU1_128: U1.128 U2.128 | length 14.1
  Bottom Layer w0.127: U2.128 22.8,-4.75 23.15,-4.4 23.15,-3.1 24.27,-1.98 31.51,-1.98 U1.128
NetU1_129: U1.129 U2.129 | length 9.2
  Top Layer w0.127: U2.129 22,-4.25 22.85,-3.4 22.85,-1.3 23.35,-0.8 U1.129
NetU1_130: U1.130 U2.130 | length 10.7
  Top Layer w0.127: U2.130 21.9,-3.75 22.55,-3.1 22.55,0.1 22.95,0.5 26.49,0.5 U1.130
NetU1_131: U1.131 U2.131 | length 14.3
  Bottom Layer w0.127: U2.131 22.6,-3.25 23.35,-2.5 23.35,-1.068 24.634,0.216 29.314,0.216 U1.131
NetU1_132: U1.132 U2.132 | length 14.4
  Bottom Layer w0.127: U2.132 22.6,-2.75 23.05,-2.3 23.05,-0.8 24.35,0.5 31.57,0.5 U1.132
NetU1_133: U1.133 U2.133 | length 7.3
  Top Layer w0.127: U2.133 16,4.55 U1.133
NetU1_134: U1.134 U2.134 | length 7.6
  Top Layer w0.127: U2.134 15.5,4.5 16.65,5.65 16.65,7.74 U1.134
NetU1_135: U1.135 U2.135 | length 12.8
  Bottom Layer w0.127: U2.135 15,3.95 16.934,5.884 16.934,10.564 U1.135
NetU1_136: U1.136 U2.136 | length 13
  Bottom Layer w0.127: U2.136 14.5,3.95 16.65,6.1 16.65,12.82 U1.136
NetU1_137: U1.137 U2.137 | length 7.1
  Top Layer w0.127: U2.137 14,3.85 15.41,5.26 U1.137
NetU1_138: U1.138 U2.138 | length 7.2
  Top Layer w0.127: U2.138 13.5,4.15 14.15,4.8 14.15,8 U1.138@15.15,9
NetU1_139: U1.139 U2.139 | length 12.6
  Bottom Layer w0.127: U2.139 13,3.6 14.35,4.95 14.35,10.52 U1.139
NetU1_140: U1.140 U2.140 | length 12.8
  Bottom Layer w0.127: U2.140 12.5,3.55 14.05,5.1 14.05,12.76 U1.140
NetU1_141: U1.141 U2.141 | length 6.9
  Top Layer w0.127: U2.141 12,4.55 12.87,5.42 U1.141
NetU1_142: U1.142 U2.142 | length 7.1
  Top Layer w0.127: U2.142 11.57,2.57 11.57,7.74 U1.142
NetU1_143: U1.143 U2.143 | length 12.4
  Bottom Layer w0.127: U2.143 11,3.95 11.854,4.804 11.854,10.564 U1.143
NetU1_144: U1.144 U2.144 | length 12.6
  Bottom Layer w0.127: U2.144 10.5,3.95 11.57,5.02 11.57,12.82 U1.144
NetU1_145: U1.145 U2.145 | length 6.7
  Top Layer w0.127: U2.145 10,3.85 10.35,4.2 10.35,6.48 U1.145
NetU1_146: U1.146 U2.146 | length 7.1
  Top Layer w0.127: U2.146 9.5,4.15 9.07,4.58 9.07,8 U1.146@10.07,9
NetU1_147: U1.147 U2.147 | length 12.1
  Bottom Layer w0.127: U2.147 9,3.6 9.27,3.87 9.27,10.52 U1.147
NetU1_148: U1.148 U2.148 | length 12.4
  Bottom Layer w0.127: U2.148 8.5,3.55 8.97,4.02 8.97,12.76 U1.148
NetU1_149: U1.149 U2.149 | length 6.6
  Top Layer w0.127: U1.149 8,6.29 U2.149
NetU1_150: U1.150 U2.150 | length 7.5
  Top Layer w0.127: U2.150 7.5,4.64 6.49,5.65 6.49,7.74 U1.150
NetU1_151: U1.151 U2.151 | length 12.1
  Bottom Layer w0.127: U2.151 7,5.15 6.774,5.376 6.774,10.564 U1.151
NetU1_152: U1.152 U2.152 | length 12.2
  Bottom Layer w0.127: U2.152 6.5,12.83 U1.152
NetU1_153: U1.153 U2.153 | length 6.8
  Top Layer w0.127: U1.153 5.25,5.26 6,4.51 U2.153
NetU1_154: U1.154 U2.154 | length 7.5
  Top Layer w0.127: U1.154@4.99,9 3.99,8 3.99,5.7 5.5,4.19 U2.154
NetU1_155: U1.155 U2.155 | length 12.4
  Bottom Layer w0.127: U2.155 5,4.65 4.19,5.46 4.19,10.52 U1.155
NetU1_156: U1.156 U2.156 | length 12.4
  Bottom Layer w0.127: U2.156 4.5,4.49 3.89,5.1 3.89,12.76 U1.156
NetU1_157: U1.157 U2.157 | length 6.6
  Top Layer w0.127: U1.157@2.75,6.1 4,4.85 U2.157
NetU1_158: U1.158 U2.158 | length 7.9
  Top Layer w0.127: U1.158 1.41,7.74 1.41,5.84 3.5,3.75 U2.158
NetU1_159: U1.159 U2.159 | length 12.5
  Bottom Layer w0.127: U1.159 1.694,10.564 1.694,5.556 3,4.25 U2.159
NetU1_160: U1.160 U2.160 | length 12.6
  Bottom Layer w0.127: U2.160 2.5,3.95 1.41,5.04 1.41,12.82 U1.160
NetU1_161: U1.161 U2.161 | length 7.3
  Top Layer w0.127: U1.161 0.17,5.18 2,3.35 U2.161
NetU1_162: U1.162 U2.162 | length 8.5
  Top Layer w0.127: U1.162@-0.09,9 -1.09,8 -1.09,5.14 0.05,4 0.9,4 1.5,3.4 U2.162
NetU1_163: U1.163 U2.163 | length 12.8
  Bottom Layer w0.127: U1.163 -0.89,10.52 -0.89,5.44 1,3.55 U2.163
NetU1_164: U1.164 U2.164 | length 12.9
  Bottom Layer w0.127: U1.164 -1.19,12.76 -1.19,5.24 0.5,3.55 U2.164
NetU1_165: U1.165 U2.165 | length 8
  Top Layer w0.127: U1.165 -2.37,5.02 -1.75,4.4 -0.8,4.4 0,3.6 U2.165
NetU1_166: U1.166 U2.166 | length 8.9
  Top Layer w0.127: U1.166 -3.67,7.74 -3.67,5.82 -1.85,4 -1.05,4 -0.5,3.45 U2.166
NetU1_167: U1.167 U2.167 | length 13
  Bottom Layer w0.127: U1.167 -3.386,10.564 -3.386,6.136 -1,3.75 U2.167
NetU1_168: U1.168 U2.168 | length 13.1
  Bottom Layer w0.127: U1.168 -3.67,12.82 -3.67,5.82 -1.5,3.65 U2.168
NetU1_169: U1.169 U2.169 | length 8.6
  Top Layer w0.127: U1.169 -4.91,4.96 -4.65,4.7 -3.1,4.7 -2,3.6 U2.169
NetU1_170: U1.170 U2.170 | length 9.9
  Top Layer w0.127: U1.170@-5.17,9 -6.17,8 -6.17,4.72 -5.85,4.4 -3.3,4.4 -3.043,4.143 -3.015,4.115 -2.5,3.6 U2.170
NetU1_171: U1.171 U2.171 | length 14.2
  Bottom Layer w0.127: U1.171 -5.97,10.52 -5.97,5.72 -4.95,4.7 -3.25,4.7 -3,4.45 U2.171
NetU1_172: U1.172 U2.172 | length 14.1
  Bottom Layer w0.127: U1.172 -6.27,12.76 -6.27,5.52 -5.15,4.4 -3.85,4.4 -3.5,4.05 U2.172
NetU1_173: U1.173 U2.173 | length 9.2
  Top Layer w0.127: U1.173 -7.45,4.6 -6.95,4.1 -4.85,4.1 -4,3.25 U2.173
NetU1_174: U1.174 U2.174 | length 10.7
  Top Layer w0.127: U1.174 -8.75,7.74 -8.75,4.2 -8.35,3.8 -5.15,3.8 -4.5,3.15 U2.174@-4.5,2.5
NetU1_175: U1.175 U2.175 | length 14.3
  Bottom Layer w0.127: U1.175 -8.466,10.564 -8.466,5.884 -7.182,4.6 -5.75,4.6 -5,3.85 U2.175
NetU1_176: U1.176 U2.176 | length 14.4
  Bottom Layer w0.127: U1.176 -8.75,12.82 -8.75,5.6 -7.45,4.3 -5.95,4.3 -5.5,3.85 U2.176
pads on no net: U2.0
copper on no net:
  other v1: 5.25,-13.5

## Keep-outs
Keep-Out Layer:
  the board outline again, w0.203

## Silkscreen, mask and mechanical layers (free items; w line width, h text height)
Top Overlay:
  text "136" at 19.8,13.7 h1
  text "133" at 19.7,6.1 h1
  text "173" at -11.7,5.8 h1
  text "4" at -22.6,1.8 h1 r270
  text "129" at 25.6,1.1 h1 r90
  text "132" at 33.4,1.1 h1 r90
  text "44" at -22.9,-28.1 h1 r270
  text "42" at -17.8,-28.1 h1 r270
  text "41" at -15.2,-28.1 h1 r270
  text "89" at 25.8,-29.5 h1 r90
  text "92" at 33.5,-29.6 h1 r90
  text "85" at 19.8,-33.9 h1
  text "45" at -10.9,-34 h1
  text "AVP32F2812-V1.1" at -23.5,-37.9 h1.2
  text "2025/7/1" at -23.2,-40 h1.2
  text "48" at -10.9,-41.6 h1
  text "88" at 19.9,-41.6 h1

## Text inside footprints (layer, text, board x,y; h text height)
U2: Top Overlay "175" at -8.443,-0.426 h1; Top Overlay "176" at -9.078,2.114 h1; Top Overlay "44" at -11.514,-26.073 h1; Top Overlay "43" at -8.974,-25.565 h1; Top Overlay "134" at 16.254,2.159 h1; Top Overlay "133" at 16.889,-0.381 h1; Top Overlay "131" at 19.182,-2.623 h1 r90; Top Overlay "132" at 21.722,-1.988 h1 r90; Top Overlay "89" at 19.22,-26.708 h1 r90; Top Overlay "90" at 21.76,-26.073 h1 r90; Top Overlay "87" at 16.254,-27.432 h1; Top Overlay "88" at 16.889,-29.972 h1; Top Overlay "46" at -7.323,-30.01 h1; Top Overlay "45" at -7.958,-27.47 h1; Top Overlay "1" at -8.466,-1.943 h1; Top Overlay "PIN1" at -18.2,2.8 h1.5; Top Overlay "2" at -11.006,-2.578 h1